# Altium PCB Karta_ILS.PCBDOC (part 6 of 9)
Units mm, origin at the board's own origin, x right, y up, seen from the top; angles counter-clockwise.
Board outline 70 x 83.2 mm, 6 copper layers (TopLayer, Layer 1, Layer 2, Layer 3, Layer 4, Bottom Layer), stack 0.914 mm thick; 406 components, 271 nets, 1327 pads, 719 vias.
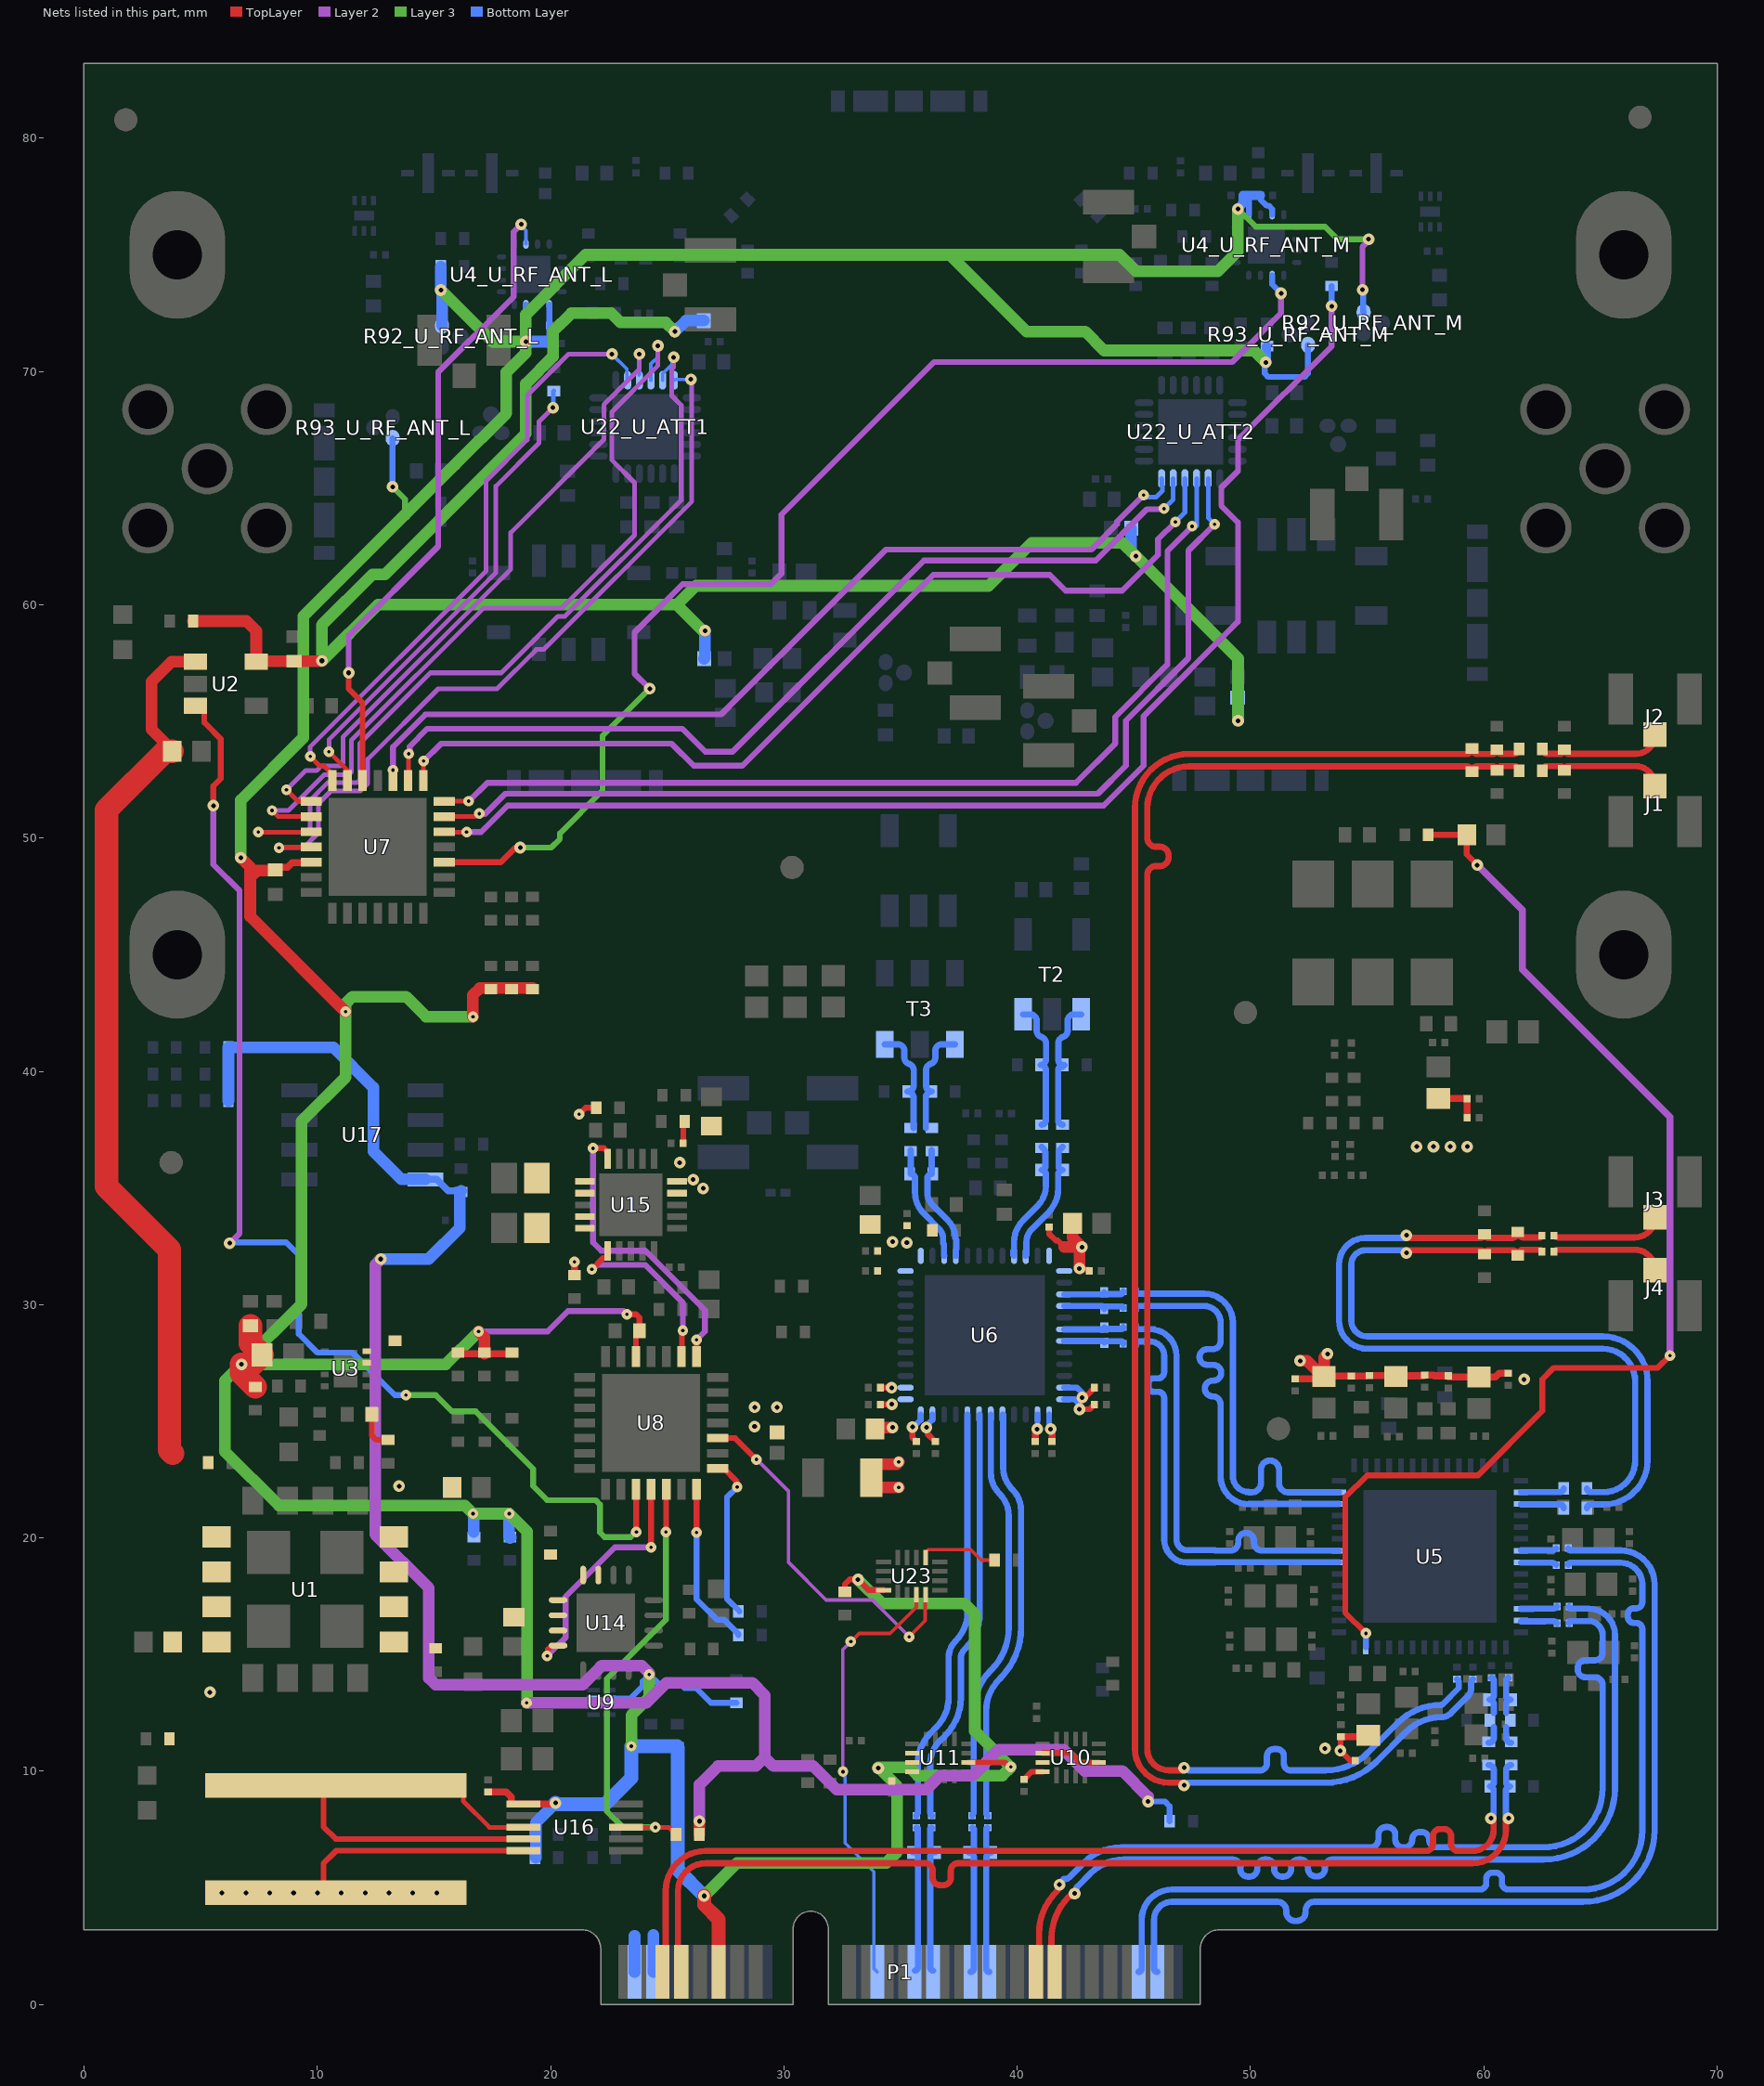
[diagram p7: the nets of this part, all layers, seen from the top]

## Via types
v1: diameter 0.5, hole 0.2, TopLayer to Bottom Layer, tented both sides, 456 vias
v2: diameter 0.45, hole 0.15, TopLayer to Bottom Layer, tented both sides, 237 vias
v3: diameter 0.45, hole 0.15, TopLayer to Bottom Layer, 23 vias
v4: diameter 0.5, hole 0.2, TopLayer to Bottom Layer, 3 vias

## Nets (pads, with @x,y where several pads share a name; then routed paths per layer and width w, separated by ;. In a path a pad name is that pad's centre, name@x,y a point inside that pad or via, vN(x,y) a via of type N, cw(c..) or ccw(c..) an arc to the next point about the centre after c; other vN are vias at no path point) (continued)
3V3_DIGIT: C9.2 C12_U_RF_ANT_L.1 C12_U_RF_ANT_M.1 C13_U_RF_ANT_L.2 C13_U_RF_ANT_M.2 C67.2 C68.2 FB1.2 R10.1 R11.1 R57.1 R58.1 R59.1 R64.1 R67.1 R68.1 R69.1 R86_U_RF_ANT_L.2 R86_U_RF_ANT_M.2 R92_U_RF_ANT_L.2 R92_U_RF_ANT_M.2 R93_U_RF_ANT_L.2 R93_U_RF_ANT_M.2 R107.2 R124.2 U4_U_RF_ANT_L.5 U4_U_RF_ANT_L.7 U4_U_RF_ANT_M.5 U4_U_RF_ANT_M.7 U7.5 U8.5 U9.7 | length 241.5
  TopLayer w0.25: v2(23.269,29.581) 23.664,29.581 23.81,29.435 C67.2@23.81,28.876 23.81,28.826 23.66,28.676 U8.5@23.66,27.779
  TopLayer w0.3: C68.2@8.203,48.569 8.378,48.744 8.728,48.744 8.921,48.938 9.711,48.938 U7.5@9.744,48.97 ; R69.1@16.032,27.892 17.162,27.892 R67.1@18.351,27.892
  TopLayer w0.5: v1(6.724,49.155) 7.125,48.754 7.125,48.314 ; C68.2@8.203,48.607 7.418,48.607 7.125,48.314 ; v2(11.214,42.555) 7.125,46.644 7.125,48.314 ; v2(16.673,42.343) 16.673,43.277 16.966,43.57 R59.1@19.223,43.57 ; v2(16.916,28.848) 17.162,28.603 R68.1@17.162,27.942 R68.1@17.162,27.892 ; R107.2@26.379,7.285 v1(26.379,7.858)
  TopLayer w1: C9.2@7.134,29.095 7.134,28.347 FB1.2@7.636,27.846 7.233,27.442 v4(6.751,27.442) 6.751,27.062 R124.2@7.339,26.475
  Layer 2 w0.25: v2(16.916,28.848) 19.877,28.848 20.747,29.719 23.131,29.719 v2(23.269,29.581) ; v1(54.8,73.5) 54.8,75.342 55.059,75.601 v1(55.059,75.669)
  Layer 2 w0.5: v2(18.976,12.931) 24.105,12.931 24.959,13.785 28.646,13.785 28.649,13.788 29.179,13.258 29.179,10.597 ; v1(26.379,7.858) 26.379,9.42 27.179,10.22 28.802,10.22 29.179,10.597 ; v1(45.61,8.703) 45.61,8.908 44.503,10.015 42.887,10.015 41.975,10.926 39.203,10.926 38.083,9.806 36.698,9.806 36.101,9.209 32.269,9.209 31.257,10.22 29.555,10.22 29.179,10.597
  Layer 3 w0.25: v1(13.229,65.054) 13.758,64.524 13.758,63.858 ; v1(49.463,76.962) 50.226,76.2 53.2,76.2 53.731,75.669 v1(55.059,75.669)
  Layer 3 w0.5: v1(6.724,49.155) 6.724,51.621 9.4,54.297 9.4,59.5 13.758,63.858 15.9,66 18.1,68.2 18.1,69.966 18.936,70.803 v1(18.936,71.278) ; v1(15.294,73.489) 17.505,71.278 v1(18.936,71.278) ; v2(16.673,42.343) 14.661,42.343 13.804,43.2 11.507,43.2 11.214,42.907 v2(11.214,42.555) 11.214,39.749 9.332,37.866 9.332,30.023 v4(6.751,27.442) ; v2(16.916,28.848) 15.51,27.442 v4(6.751,27.442) ; v2(18.976,12.931) 18.987,12.941 18.987,20.28 v2(18.227,21.04) v2(16.674,21.04) 16.322,21.392 8.352,21.392 6.05,23.693 6.05,26.741 v4(6.751,27.442) ; v1(49.463,76.962) 49.463,75.16 48.603,74.3 45.082,74.3 44.382,75 37.108,75 ; v1(50.659,70.391) 50.15,70.9 43.724,70.9 42.916,71.708 40.4,71.708 37.108,75 ; v1(18.936,71.278) 18.936,72.436 21.5,75 37.108,75
  Bottom Layer w0.25: v1(13.229,65.054) R93_U_RF_ANT_L.2@13.229,67.143 ; v1(18.936,71.278) 18.934,71.281 18.934,72.854 U4_U_RF_ANT_L.7@18.944,72.864 ; 19.944,71.4 C12_U_RF_ANT_L.1@19.944,71.982 U4_U_RF_ANT_L.5@19.944,72.864 ; v1(45.61,8.703) 46.331,8.703 46.532,8.502 R64.1@46.532,7.858 ; C13_U_RF_ANT_M.2@49.688,77.534 49.928,77.294 U4_U_RF_ANT_M.5@49.928,76.719 ; 50.454,77.34 50.685,77.109 50.782,77.109 50.928,76.962 U4_U_RF_ANT_M.7@50.928,76.719 ; v1(50.659,70.391) 50.611,70.343 50.611,69.915 50.757,69.769 52.317,69.769 52.463,69.915 R93_U_RF_ANT_M.2@52.463,71.138 ; v1(54.8,73.5) 54.824,73.476 54.824,72.563 R92_U_RF_ANT_M.2@54.848,72.538
  Bottom Layer w0.4: v1(49.463,76.962) 49.463,76.989 49.688,77.214 49.688,77.534 C13_U_RF_ANT_M.2@49.688,77.544 C12_U_RF_ANT_M.1@50.429,77.544 ; v1(50.659,70.391) 50.678,70.41 50.678,71.063 50.703,71.088 R86_U_RF_ANT_M.2@50.708,71.088
  Bottom Layer w0.5: R86_U_RF_ANT_L.2@15.294,74.5 v1(15.294,73.489) 15.35,73.433 R92_U_RF_ANT_L.2@15.35,71.961 ; v2(16.674,21.04) 16.711,21.003 16.711,20.264 ; v2(18.227,21.04) 18.227,20.081 18.288,20.019 R11.1@18.257,19.989 ; v1(18.936,71.278) C13_U_RF_ANT_L.2@19.822,71.278
3V3_MB: C14.1 C70.1 C153.2 C154.2 P1.11 R1.1 R63.2 R65.2 R66.2 R75.1 R76.2 R110.1 R111.1 R112.2 R113.2 U9.2 U10.6 U10.14 U10.15 U10.16 U11.6 U11.14 U11.15 U11.16 U16.6 U17.8 U23.16 | length 123.9
  TopLayer w0.25: R75.1@32.61,17.689 32.61,18.003 32.828,18.221 v1@33.173,18.221 ; v1(33.179,18.214) 33.629,17.764 U23.16@34.277,17.764 ; U11.6@37.9,10.379 39.473,10.379 39.669,10.182 v3(39.727,10.182) ; C70.1@40.287,9.65 40.297,9.65 40.322,9.675 40.322,9.68 40.62,9.979 U10.16@41.095,9.979 ; U10.14@41.095,10.779 42.288,10.779 42.688,10.379 U10.6@43.495,10.379
  TopLayer w0.3: C153.2@17.323,9.107 18.102,9.107 18.316,8.893 18.316,8.594 U16.6@18.827,8.594 20.111,8.594 20.155,8.638 v1(20.209,8.638)
  TopLayer w0.6: v1(26.579,4.655) 26.579,4.274 27.2,3.653 P1.11@27.2,1.4
  Layer 2 w0.5: v1(12.725,31.953) 12.48,31.708 12.48,20.153 14.783,17.85 14.783,13.993 15.076,13.7 21.376,13.7 22.195,14.52 23.91,14.52 24.224,14.206 v2(24.224,14.148)
  Layer 3 w0.5: v3(23.465,11.069) 23.465,12.401 24.224,13.161 v2(24.224,14.148) ; v1(26.579,4.655) 27.995,6.071 34.391,6.071 34.86,6.54 34.86,9.356 34.087,10.13 v1(34.046,10.13) ; v1(33.179,18.214) 34.198,17.196 37.731,17.196 38.184,16.742 38.184,11.721 39.724,10.182 v3(39.727,10.182) ; v1@34.046,10.171 35.372,10.171 35.732,9.811 39.36,9.811 v3@39.727,10.178
  Bottom Layer w0.2: U9.2@22.514,13.131 23.428,13.131
  Bottom Layer w0.25: 23.428,13.131 23.952,13.656 23.952,13.855 24.224,14.127 v2(24.224,14.148) 24.656,13.716 25.589,13.716 25.745,13.56 26.243,13.56 26.875,12.928 R1.1@27.966,12.928
  Bottom Layer w0.3: U17.8@14.637,35.374 15.112,35.374 15.605,34.88 R112.2@16.161,34.88
  Bottom Layer w0.5: R63.2@6.19,38.743 R76.2@6.19,39.886 R113.2@6.19,41.029 10.686,41.029 12.404,39.312 12.404,36.577 13.607,35.374 U17.8@14.637,35.374 ; v1(12.725,31.953) 14.774,31.953 16.111,33.29 16.111,34.83 R112.2@16.161,34.88 ; R111.1@19.378,6.297 19.378,7.282 19.375,7.285 19.375,7.805 v1(20.209,8.638)
  Bottom Layer w0.6: v1(20.209,8.638) 20.255,8.592 22.352,8.592 23.465,9.705 v3(23.465,11.069) 25.429,11.069 R66.2@25.429,11.019 25.453,10.995 25.453,5.78 v1(26.579,4.655)
3V6_DCDC: C2.2 C6.2 C91.2 C139.2 C140.2 R2.2 R97.2 R120.2 R123.1 U1.9 U1.10 U1.11 U1.12 U3.7 U3.8 U14.1 U14.2 U14.3 U14.15 U14.16 U15.1 U15.2 U15.4 U15.5 | length 1.7
  TopLayer w0.25: C6.2@12.34,25.299 12.34,24.388 12.527,24.201 R2.2@13.029,24.201
  other v4: 13.508,22.219
5V: C4.2 FB24.1 FB25.1 FB26.1 FB27.1 R122.2 U2.5 | length 84.1
  TopLayer w0.5: R122.2@4.679,59.3 6.96,59.3 7.384,58.876 U2.5@7.384,57.562 7.394,57.573 8.99,57.573 C4.2@9,57.583 10.183,57.583 v1(10.2,57.6)
  Layer 3 w0.5: v1(25.33,71.708) 24.937,72.1 23,72.1 22.602,72.498 20.891,72.498 20.1,71.708 20.1,70.635 18.936,69.471 18.936,67.336 12.9,61.3 12.361,61.3 10.2,59.139 v1(10.2,57.6) 12.6,60 25.419,60 ; v1(26.622,58.889) 26.53,58.889 25.419,60 ; v1(49.465,55.025) 49.465,57.699 v1(45.082,62.082) 44.516,62.648 40.615,62.648 38.779,60.812 26.231,60.812 25.419,60
  Bottom Layer w0.5: v1(25.33,71.708) 25.801,72.178 FB24.1@26.57,72.178 ; FB26.1@26.579,57.691 26.622,57.734 v1(26.622,58.889) ; FB25.1@44.888,63.272 44.888,62.277 v1(45.082,62.082) ; FB27.1@49.454,56.026 49.465,56.014 v1(49.465,55.025)
12V: C1.2 C3.2 R3.1 R106.2 R121.2 U1.1 U1.2 U1.3 U1.4 U2.1 U16.8 U16.9 | length 57.9
  TopLayer w0.2: R106.2@10.267,8.965 10.692,9.39 R106.2@10.789,9.39 15.837,9.39 16.262,8.965 16.262,8.714 17.382,7.594 U16.8@18.827,7.594
  TopLayer w0.25: R106.2@10.267,8.965 10.267,7.62 10.793,7.094 U16.9@18.827,7.094
  TopLayer w0.5: C3.2@3.783,53.721 3.783,53.771 2.895,54.66 2.895,56.696 3.761,57.562 U2.1@4.784,57.562
  TopLayer w1: C3.2@3.783,53.721 3.489,53.721 0.965,51.198 0.965,35.06 3.661,32.364 3.661,23.769 3.8,23.629
  other v4: 5.401,13.387
2122_0VDD: C88.2 C89.2 C90.2 C179.2 FB7.2 U6.25 U6.26 U6.35 U6.36 | length 9
  TopLayer w0.25: v1(35.509,24.753) 35.509,24.304 35.642,24.172 35.642,24.162 35.667,24.137 C90.2@35.677,24.137 ; v1(36.109,24.732) 36.157,24.685 36.157,24.462 36.482,24.137 C179.2@36.492,24.137
  TopLayer w0.3: C89.2@40.779,24.137 40.779,24.538 40.855,24.614 v1(40.855,24.668) ; v1(41.431,24.668) 41.431,24.614 41.492,24.552 C88.2@41.492,24.137
  TopLayer w0.5: v3(34.924,22.166) 33.975,22.166 33.75,22.391 FB7.2@33.75,22.585 33.75,22.93 33.975,23.155 34.825,23.155 v3(34.924,23.254)
  Bottom Layer w0.25: v1(35.509,24.753) 35.553,24.753 35.867,25.067 U6.36@35.867,25.292 ; v1(36.109,24.732) 36.157,24.78 36.157,24.857 36.367,25.067 U6.35@36.367,25.292 ; U6.25@41.367,25.292 41.367,24.799 41.431,24.736 v1(41.431,24.668) ; v1@40.867,24.681 U6.26@40.867,25.292 v1@40.867,24.681 ; v1@40.867,24.681 v1(40.855,24.668) v1@40.867,24.681
2122_VCC: C76.2 C77.2 C78.2 C79.2 C80.2 C81.2 C82.2 C83.2 C84.2 C85.2 C86.2 C87.2 FB6.2 R96.1 U6.1 U6.12 U6.13 U6.23 U6.24 U6.37 U6.38 U6.48 | length 9.8
  TopLayer w0.25: C81.2@34.129,25.723 34.135,25.728 34.626,25.728 v1(34.631,25.734) ; C83.2@34.129,26.442 34.132,26.44 34.612,26.44 v1(34.615,26.438) ; C77.2@41.367,33.328 41.367,33.03 41.652,32.745 41.733,32.745 42.015,32.463 ; v1(42.669,25.516) 43.104,25.516 43.277,25.688 43.287,25.688 43.312,25.713 C80.2@43.312,25.723 ; v1(42.669,31.552) 42.717,31.504 43.025,31.504 43.046,31.483 43.056,31.483 43.081,31.458 C78.2@43.081,31.448 ; v1(42.786,26.018) 42.834,26.066 42.945,26.066 43.312,26.432 C85.2@43.312,26.442
  TopLayer w0.5: C86.2@33.899,24.663 33.967,24.731 v1(34.658,24.731) ; 42.015,32.463 v1(42.772,32.463) ; C76.2@42.372,33.486 42.372,32.863 v1(42.772,32.463) ; v1(42.669,31.552) 42.669,32.36 v1(42.772,32.463)
  Bottom Layer w0.25: U6.24@42.017,25.942 42.452,25.942 42.669,25.725 v1(42.669,25.516) ; U6.23@42.017,26.442 42.561,26.442 42.786,26.218 v1(42.786,26.018)
  other v1: 28.744,24.772 28.744,25.598 29.701,25.602 35.27,32.652 34.661,32.692
4610_FINE_3V3: C93.2 C94.2 C97.2 C98.2 C101.2 C102.2 C105.2 C106.2 C109.2 C110.2 C129.2 C130.2 FB8.1 FB9.1 FB10.1 FB11.1 FB12.1 R100.2 R104.2 R105.2 U15.14 U15.15 | length 18.6
  TopLayer w0.25: v2(21.223,38.16) 21.505,38.442 R104.2@22.01,38.442 ; C130.2@25.68,36.925 25.688,36.934 25.688,37.847 R100.2@25.696,37.855 ; C98.2@53.873,11.481 53.859,11.468 53.859,10.894 v1(53.846,10.881) 54.266,10.461 C97.2@54.495,10.461
  TopLayer w0.3: R105.2@21.023,31.214 v2(21.023,31.834) ; C105.2@51.923,26.821 53.052,26.821 FB11.1@53.151,26.919 53.179,26.948 C106.2@54.314,26.948 54.324,26.948 54.331,26.941 54.977,26.941 54.993,26.956 C102.2@55.091,26.956 56.19,26.956 FB10.1@56.234,26.913 56.27,26.949 C101.2@57.408,26.949 ; C98.2@53.978,11.474 54.979,11.474 FB9.1@55.049,11.544 ; C101.2@57.471,26.977 57.847,26.977 57.874,26.949 C94.2@58.484,26.949 ; FB12.1@58.054,38.836 C110.2@59.278,38.836 C109.2@59.278,38.01 ; C94.2@58.484,26.906 59.779,26.906 FB8.1@59.788,26.898 60.498,26.898 60.656,27.056 60.941,27.056 C93.2@61.049,27.056
  TopLayer w0.5: v1(52.126,27.592) 52.427,27.592 53.101,26.919 FB11.1@53.151,26.919 53.151,27.742 v1(53.298,27.889)
  other v1: 53.194,10.977 61.73,26.792 26.538,34.985 26.11,35.361 25.535,36.091 57.119,36.77 57.842,36.77 58.565,36.77 59.288,36.77
04610_Stat0: R5.1 U23.9 | length 3.4
  TopLayer w0.15: U23.9@36.077,19.164 36.077,19.389 36.187,19.5 38.006,19.5 38.456,19.05 R5.1@39.033,19.05
04610_Stat0_3V3: U8.24 U23.4 | length 15.6
  TopLayer w0.15: v2(35.372,15.761) 36.06,16.45 36.06,17.548 U23.4@36.077,17.564
  TopLayer w0.25: U8.24@27.16,24.279 27.91,24.279 v2(28.827,23.363)
  Layer 2 w0.15: v2(28.827,23.363) 30.2,21.99 30.2,18.946 31.81,17.336 33.797,17.336 v2(35.372,15.761)
+12: P1.2 P1.4 R106.1 U16.10 | length 13.5
  TopLayer w0.25: R106.1@10.789,4.79 10.692,4.79 10.267,5.215 10.267,6.053 10.808,6.594 U16.10@18.827,6.594
  Bottom Layer w0.5: P1.2@23.6,1.4 23.6,2.952 ; P1.4@24.4,1.4 24.4,2.99
  other v1: 5.921,4.776 6.942,4.776 7.964,4.776 8.986,4.776 10.008,4.776 11.029,4.776 12.051,4.776 13.073,4.776 14.095,4.776 15.117,4.776
Ain_2122_A_N: R47.1 R49.2 U6.4 | length 5.1
  Bottom Layer w0.268: R49.2@36.342,36.627 36.337,36.627 36.337,35.604 ccw(c36.337,35.418) 36.151,35.418 36.151,34.802 ccw(c36.891,34.802) 36.367,34.278 37.034,33.612 cw(c36.278,32.857) 37.347,32.857 37.347,32.854 cw(c37.251,32.758) 37.386,32.758 37.386,32.377 ccw(c37.41,32.353) 37.376,32.353 37.376,32.101 U6.4@37.367,32.092
AIn_2122_A_P: R45.2 R47.2 U6.3 | length 5.1
  Bottom Layer w0.268: R45.2@35.43,36.627 35.437,36.627 35.437,35.604 cw(c35.437,35.418) 35.623,35.418 35.623,34.8 ccw(c36.887,34.8) 35.993,33.906 36.658,33.241 cw(c36.271,32.854) 36.819,32.854 36.819,32.663 ccw(c36.886,32.663) 36.838,32.615 cw(c36.791,32.567) 36.858,32.567 36.858,32.101 U6.3@36.867,32.092
AIn_2122_B_N: R53.1 R56.2 U6.9 | length 5.4
  Bottom Layer w0.268: U6.9@39.867,32.092 39.839,32.12 39.839,32.291 cw(c39.887,32.291) 39.853,32.325 ccw(c39.819,32.359) 39.867,32.359 39.867,32.682 cw(c41.182,32.682) 40.252,33.612 40.875,34.235 ccw(c40.011,35.099) 41.233,35.099 41.233,35.585 ccw(c41.047,35.585) 41.047,35.771 ccw(c41.047,35.937) 41.213,35.937 41.213,36.507 ccw(c40.988,36.507) R56.2@41.147,36.666 ; R56.2@41.047,36.766 R56.2@41.147,36.666
AIn_2122_B_P: R51.2 R53.2 U6.10 | length 5.4
  Bottom Layer w0.268: U6.10@40.367,32.092 40.395,32.12 40.395,32.678 cw(c41.191,32.678) 40.628,33.241 41.326,33.939 ccw(c40.275,34.989) 41.761,34.989 41.761,35.585 cw(c41.947,35.585) 41.947,35.771 cw(c41.947,35.947) 41.771,35.947 41.771,36.403 ccw(c41.747,36.427) 41.781,36.427 41.781,36.507 cw(c42.007,36.507) 41.847,36.666 R51.2@41.947,36.766
Ain_2122A_N: R48.1 R49.1 T3.3 | length 4.8
  Bottom Layer w0.268: R49.1@36.085,37.577 36.085,38.878 cw(c36.342,38.878) R48.1@36.342,39.135 cw(c36.342,39.386) 36.091,39.386 36.091,39.68 36.091,40.058 cw(c36.359,40.058) 36.286,40.315 ccw(c36.207,40.588) 36.491,40.588 36.491,40.89 cw(c36.759,40.89) 36.759,41.158 T3.3@37.327,41.158
AIn_2122A_P: R45.1 R46.2 T3.1 | length 4.8
  Bottom Layer w0.268: T3.1@34.327,41.158 34.895,41.158 cw(c34.895,40.89) 35.163,40.89 35.163,40.588 ccw(c35.447,40.588) 35.37,40.315 cw(c35.295,40.058) 35.563,40.058 35.563,39.399 cw(c35.3,39.399) R46.2@35.3,39.135 cw(c35.3,38.878) 35.557,38.878 R45.1@35.557,37.577
AIn_2122B_N: R55.1 R56.1 T2.1 | length 5.7
  Bottom Layer w0.268: T2.1@40.248,42.443 40.566,42.443 cw(c40.566,42.175) 40.834,42.175 40.834,41.743 ccw(c41.118,41.743) 41.041,41.47 cw(c40.966,41.212) 41.234,41.212 41.234,40.504 cw(c41.006,40.504) R55.1@41.006,40.275 cw(c41.006,40.047) 41.233,40.047 41.233,37.902 cw(c41.047,37.902) R56.1@41.047,37.716
AIn_2122B_P: R51.1 R52.2 T2.3 | length 5.9
  Bottom Layer w0.268: R51.1@41.947,37.716 cw(c41.947,37.902) 41.761,37.902 41.761,40.056 cw(c41.98,40.056) R52.2@41.98,40.275 cw(c41.98,40.492) 41.762,40.492 41.762,41.212 cw(c42.03,41.212) 41.957,41.47 ccw(c41.878,41.743) 42.162,41.743 42.162,42.175 cw(c42.43,42.175) 42.43,42.443 T2.3@42.748,42.443 ; R52.2@41.947,40.192 cw(c42.03,40.192) R52.2@42.03,40.275
Alert_curr_vol_meas: R107.1 U8.19 U16.3 | length 19.5
  TopLayer w0.2: U16.3@23.227,7.594 v2(24.491,7.594) 25.069,7.594 R107.1@25.379,7.285 R107.1@25.429,7.285
  TopLayer w0.25: v2(24.945,20.249) 24.953,20.257 24.953,22.072 U8.19@24.96,22.079
  Layer 3 w0.25: v2(24.491,7.594) 23.103,7.594 22.419,8.278 22.419,13.969 24.945,16.495 v2(24.945,20.249)
ATT_330_V1: R91_U_ATT2.2 U7.19 | length 55.7
  TopLayer w0.2: U7.19@15.443,50.27 15.458,50.256 v2(16.402,50.256)
  Layer 2 w0.25: v2(16.402,50.256) 17.019,50.256 18.154,51.39 43.708,51.39 45.418,53.1 45.418,55.224 49.463,59.269 49.463,63.537 48.747,64.253 48.747,65.012 49.463,65.729 49.463,67.063 53.478,71.078 v1(53.478,72.8)
  Bottom Layer w0.25: v1(53.478,72.8) R91_U_ATT2.2@53.478,73.669
ATT_330_V2: U7.20 U22_U_ATT2.20 | length 44.1
  TopLayer w0.2: U7.20@15.443,50.92 16.754,50.92 16.881,51.048 v2(16.949,51.048)
  Layer 2 w0.25: v2(16.949,51.048) 16.973,51.024 17.18,51.024 18.056,51.9 43.459,51.9 44.659,53.1 44.659,55.031 47.338,57.71 47.338,62.324 v2(48.463,63.449)
  Bottom Layer w0.2: U22_U_ATT2.20@48.188,65.412 48.188,63.728 48.463,63.453 v2(48.463,63.449)
ATT_330_V3: U7.21 U22_U_ATT2.21 | length 42.7
  TopLayer w0.2: U7.21@15.443,51.57 15.451,51.577 16.477,51.577 v2(16.484,51.585)
  Layer 2 w0.25: v2(16.484,51.585) 16.511,51.585 17.294,52.368 42.519,52.368 44.2,54.049 44.2,55.196 46.438,57.434 46.438,62.303 v2(47.5,63.365)
  Bottom Layer w0.2: v2(47.5,63.365) 47.54,63.365 47.601,63.304 47.688,63.39 U22_U_ATT2.21@47.688,65.412
ATT_330_V4: U7.22 U22_U_ATT2.22 | length 41.1
  TopLayer w0.2: U7.22@14.544,52.47 14.544,53.266 14.561,53.284 v2(14.561,53.303)
  Layer 2 w0.25: v2(14.561,53.303) 15.308,54.049 25.186,54.049 26.135,53.1 28.22,53.1 36.4,61.28 41.4,61.28 42.08,60.6 44.502,60.6 46.038,62.136 46.038,62.809 v2(46.782,63.553)
  Bottom Layer w0.2: v2(46.782,63.553) 47.188,63.959 U22_U_ATT2.22@47.188,65.412
ATT_330_V5: U7.23 U22_U_ATT2.23 | length 40.3
  TopLayer w0.2: U7.23@13.894,52.47 13.908,52.485 13.908,53.597 v2(13.922,53.612)
  Layer 2 w0.25: v2(13.922,53.612) 13.958,53.647 13.958,53.924 14.722,54.688 25.642,54.688 26.63,53.7 27.8,53.7 36,61.9 43.366,61.9 45.562,64.096 46.269,64.096 v2(46.294,64.122)
  Bottom Layer w0.2: v2(46.294,64.122) 46.688,64.516 U22_U_ATT2.23@46.688,65.412
ATT_330_V6: U7.24 U22_U_ATT2.24 | length 39.6
  TopLayer w0.2: U7.24@13.244,52.47 v2(13.244,52.915)
  Layer 2 w0.25: v2(13.244,52.915) 13.244,53.906 14.638,55.3 27.3,55.3 34.366,62.366 43.183,62.366 44.279,63.462 44.279,63.572 v2(45.413,64.706)
  Bottom Layer w0.2: v2(45.413,64.706) 45.497,64.622 45.967,64.622 46.223,64.878 46.223,65.057 46.207,65.073 46.207,65.393 U22_U_ATT2.24@46.188,65.412
ATT_ILS_V1: R91_U_ATT1.2 U7.27 | length 21
  TopLayer w0.2: v2(10.5,53.7) 11.294,52.906 U7.27@11.294,52.47
  Layer 2 w0.2: v2(10.5,53.7) 10.5,54.219 17.658,61.376 17.658,65.086 19.503,66.931 19.503,67.851 v1(20.1,68.448)
  Bottom Layer w0.2: v1(20.1,68.448) 20.118,68.466 20.118,69.143 R91_U_ATT1.2@20.136,69.161
ATT_ILS_V2: U7.28 U22_U_ATT1.20 | length 26.6
  TopLayer w0.2: v2(9.7,53.5) 10.106,53.094 10.285,53.094 10.644,52.735 U7.28@10.644,52.47
  Layer 2 w0.2: v2(9.7,53.5) 9.7,53.914 17.231,61.445 17.231,65.298 19,67.067 19,68.968 20.778,70.746 v1(22.63,70.746)
  Bottom Layer w0.15: v1(22.63,70.746) 23.275,70.101 U22_U_ATT1.20@23.275,69.621
ATT_ILS_V3: U7.1 U22_U_ATT1.21 | length 27.9
  TopLayer w0.2: v2(8.677,52.065) 9.171,51.57 U7.1@9.744,51.57
  Layer 2 w0.2: v2(8.677,52.065) 9.505,52.893 9.979,52.893 10.186,53.1 10.991,53.1 11.108,53.217 11.108,54.332 18.295,61.519 18.295,63.095 22.28,67.08 22.28,68.576 23.807,70.103 v1(23.807,70.746)
  Bottom Layer w0.15: U22_U_ATT1.21@23.787,69.846 23.797,69.856 23.797,70.736 v1(23.807,70.746)
ATT_ILS_V4: U7.2 U22_U_ATT1.22 | length 34
  TopLayer w0.2: v2(8.061,51.185) 8.326,50.92 U7.2@9.744,50.92
  Layer 2 w0.2: v2(8.061,51.185) 8.766,51.185 10.298,52.718 11.348,52.718 11.465,52.835 11.465,54.194 17.121,59.85 20.466,59.85 23.6,62.984 23.6,65.231 22.63,66.201 22.63,68.277 24.602,70.249 v1(24.602,71.1)
  Bottom Layer w0.15: U22_U_ATT1.22@24.302,69.621 24.302,70.323 24.602,70.623 v1(24.602,71.1)
ATT_ILS_V5: U7.3 U22_U_ATT1.23 | length 35.4
  TopLayer w0.2: v2(7.47,50.256) 9.729,50.256 U7.3@9.744,50.27
  Layer 2 w0.2: v2(7.47,50.256) 9.583,50.256 9.7,50.373 9.7,51.624 10.443,52.368 11.698,52.368 11.815,52.485 11.815,54.049 14.849,57.083 17.894,57.083 20.311,59.5 20.611,59.5 25.6,64.489 25.6,68.551 25.2,68.951 25.2,70.1 25.28,70.18 v1(25.28,70.604)
  Bottom Layer w0.15: U22_U_ATT1.23@24.802,69.621 24.802,69.902 25.213,70.313 25.213,70.537 v1(25.28,70.604)
ATT_ILS_V6: U7.4 U22_U_ATT1.24 | length 32.6
  TopLayer w0.2: v2(8.362,49.585) 8.38,49.603 9.726,49.603 U7.4@9.744,49.62
  Layer 2 w0.2: v2(8.362,49.585) 9.407,49.585 10.05,50.228 10.05,51.479 10.588,52.018 11.85,52.018 12.165,52.333 12.165,53.383 15.183,56.4 17.706,56.4 19.387,58.081 19.704,58.081 26.052,64.428 26.052,69.621 v1(26.013,69.66)
  Bottom Layer w0.15: U22_U_ATT1.24@25.302,69.621 25.341,69.66 v1(26.013,69.66)
CLK_SYNC: P1.20 U23.3 | length 18.9
  TopLayer w0.15: v2(32.868,15.554) 33.225,15.911 34.555,15.911 35.677,17.033 U23.3@35.677,17.564
  Layer 2 w0.15: v2(32.535,9.981) 32.524,9.993 32.524,15.21 v2(32.868,15.554)
  Bottom Layer w0.15: v2(32.535,9.981) 32.593,9.924 32.593,9.774 32.623,9.743 32.623,6.922 33.854,5.691 33.854,1.546 P1.20@34,1.4
CLKin0_N: J1.2 R24.1 R25.2 | length 5.6
  TopLayer w0.268: R24.1@62.509,52.882 cw(c62.711,52.882) 62.711,53.084 63.273,53.084 cw(c63.273,52.905) R25.2@63.451,52.905 cw(c63.63,52.905) 63.63,53.084 66.49,53.084 cw(c66.49,52.233) J1.2@67.34,52.233
CLKin0_P: J2.2 R28.1 R30.1 | length 5.6
  TopLayer w0.268: R30.1@62.509,53.819 ccw(c62.716,53.819) 62.716,53.612 63.275,53.612 ccw(c63.275,53.79) R28.1@63.454,53.79 ccw(c63.632,53.79) 63.632,53.612 66.516,53.612 ccw(c66.516,54.435) J2.2@67.34,54.435
CLKin0P_N: C46.2 R24.2 R26.2 R27.2 | length 76
  TopLayer w0.268: v1(47.157,10.153) cw(c47.041,10.153) 47.041,10.037 46.502,10.037 cw(c46.502,10.965) 45.574,10.965 45.574,47.467 45.574,48.428 cw(c45.946,48.428) 45.946,48.8 46.115,48.8 ccw(c46.115,49.172) 46.487,49.172 46.487,49.255 ccw(c46.115,49.255) 46.115,49.627 45.946,49.627 cw(c45.946,49.999) 45.574,49.999 45.574,51.018 45.574,51.281 cw(c47.368,51.281) 47.368,53.075 59.254,53.075 cw(c59.254,52.839) R27.2@59.49,52.839 cw(c59.726,52.839) 59.726,53.075 60.399,53.075 cw(c60.399,52.905) R26.2@60.569,52.905 cw(c60.75,52.905) 60.75,53.086 61.305,53.086 cw(c61.305,52.882) R24.2@61.509,52.882
  Bottom Layer w0.268: v1(47.157,10.153) 47.219,10.153 47.335,10.037 50.28,10.037 50.414,10.037 ccw(c50.414,10.327) 50.704,10.327 50.704,10.657 cw(c50.994,10.657) 50.994,10.947 51.139,10.947 cw(c51.139,10.657) 51.429,10.657 51.429,10.327 ccw(c51.719,10.327) 51.719,10.037 52.984,10.037 53.225,10.037 ccw(c53.225,12.577) 55.021,10.781 56.32,12.081 cw(c58.163,10.238) 58.163,12.844 ; 58.164,12.844 ccw(c58.164,12.941) 58.233,12.872 58.928,13.568 58.928,13.773 ccw(c58.686,13.773) 58.857,13.945 C46.2@58.847,13.945
CLKin0P_P: C47.2 R27.1 R29.1 R30.2 | length 76
  TopLayer w0.268: v1(47.157,9.393) ccw(c47.041,9.393) 47.041,9.509 46.502,9.509 cw(c46.502,10.965) 45.046,10.965 45.046,51.281 cw(c47.368,51.281) 47.368,53.603 59.254,53.603 ccw(c59.254,53.839) R27.1@59.49,53.839 ccw(c59.726,53.839) 59.726,53.603 60.369,53.603 ccw(c60.369,53.79) R29.1@60.556,53.79 ccw(c60.732,53.79) 60.732,53.614 61.305,53.614 ccw(c61.305,53.819) R30.2@61.509,53.819
  Bottom Layer w0.268: v1(47.157,9.393) 47.219,9.393 47.335,9.509 53.227,9.509 ccw(c53.227,12.57) 55.392,10.406 56.693,11.707 cw(c58.164,10.235) 58.164,12.316 58.166,12.316 ccw(c58.166,12.937) 58.605,12.498 59.302,13.195 ccw(c58.93,13.567) 59.456,13.567 59.456,13.773 cw(c59.699,13.773) 59.528,13.945 C47.2@59.538,13.945
CLKin1_N: P1.5 R37.1 R39.1 | length 45.1
  TopLayer w0.268: P1.5@24.8,1.4 ccw(c24.8,1.536) 24.936,1.536 24.936,4.871 cw(c26.646,4.871) 26.646,6.581 57.378,6.581 57.512,6.581 ccw(c57.512,6.891) 57.822,6.891 57.822,7.213 cw(c58.133,7.213) 58.133,7.524 58.288,7.524 cw(c58.288,7.213) 58.598,7.213 58.598,6.891 ccw(c58.909,6.891) 58.909,6.581 59.507,6.581 ccw(c59.507,7.494) 60.421,7.494 60.421,7.869 ccw(c60.305,7.869) v1(60.305,7.985)
  Bottom Layer w0.268: R39.1@60.21,10.266 cw(c60.21,10.044) 60.431,10.044 60.431,9.519 cw(c60.26,9.519) R37.1@60.26,9.347 cw(c60.26,9.186) 60.421,9.186 60.421,8.101 cw(c60.305,8.101) v1(60.305,7.985)
CLKin1_P: P1.7 R31.1 R32.2 | length 45.1
  TopLayer w0.268: P1.7@25.6,1.4 cw(c25.6,1.536) 25.464,1.536 25.464,4.871 cw(c26.646,4.871) 26.646,6.053 35.157,6.053 36.067,6.053 cw(c36.067,5.743) 36.377,5.743 36.377,5.425 ccw(c36.688,5.425) 36.688,5.115 36.843,5.115 ccw(c36.843,5.425) 37.153,5.425 37.153,5.743 cw(c37.464,5.743) 37.464,6.053 38.1,6.053 59.507,6.053 ccw(c59.507,7.494) 60.949,7.494 60.949,7.869 cw(c61.065,7.869) v1(61.065,7.985)
  Bottom Layer w0.268: v1(61.065,7.985) cw(c61.065,8.101) 60.949,8.101 60.949,9.165 cw(c61.13,9.165) R32.2@61.13,9.347 cw(c61.13,9.519) 60.959,9.519 60.959,10.049 cw(c61.176,10.049) R31.1@61.176,10.266
CLKin1P_N: C59.2 R34.1 R38.1 R39.2 | length 2.6
  Bottom Layer w0.267: R39.2@60.21,11.216 ccw(c60.21,11.435) 60.429,11.435 60.429,11.889 ; C59.2@60.323,13.999 cw(c60.323,13.893) 60.429,13.893 60.429,13.253 cw(c60.243,13.253) 60.243,13.066 cw(c60.243,12.88) 60.429,12.88 60.429,12.489
CLKin1P_P: C54.2 R31.2 R33.2 R34.2 | length 2.6
  Bottom Layer w0.267: 60.956,11.889 60.956,11.435 ccw(c61.176,11.435) R31.2@61.176,11.216 ; 60.956,12.489 60.956,12.88 cw(c61.143,12.88) 61.143,13.066 cw(c61.143,13.253) 60.956,13.253 60.956,13.893 cw(c61.063,13.893) C54.2@61.063,13.999
CLKout1_C2_N: C58.1 J4.2 | length 4.9
  TopLayer w0.268: C58.1@63.004,32.272 C58.1@63.004,32.282 ; C58.1@63.004,32.283 cw(c63.177,32.109) 63.177,32.354 66.464,32.354 cw(c66.464,31.478) J4.2@67.34,31.478
CLKout1_C2_P: C57.1 J3.2 | length 4.9
  TopLayer w0.268: C57.1@63.007,32.953 ccw(c63.18,33.127) 63.18,32.882 66.477,32.882 ccw(c66.477,33.745) J3.2@67.34,33.745 ; C57.1@63.007,32.954 C57.1@63.007,32.964
CLKout1_C_N: C58.2 R36.2 R41.2 R42.1 | length 33
  TopLayer w0.267: R42.1@60.037,32.112 cw(c60.093,32.112) R42.1@60.093,32.168
  TopLayer w0.268: v1(56.684,32.214) cw(c56.8,32.214) 56.8,32.33 59.873,32.33 59.873,32.326 cw(c59.873,32.162) R42.1@60.037,32.162 cw(c60.201,32.162) 60.201,32.326 61.247,32.326 cw(c61.247,32.118) R41.2@61.455,32.118 cw(c61.691,32.118) 61.691,32.354 62.402,32.354 cw(c62.402,32.272) C58.2@62.484,32.272
  Bottom Layer w0.268: v1(56.684,32.214) ccw(c56.568,32.214) 56.568,32.33 54.925,32.33 ccw(c54.925,31.728) 54.323,31.728 54.323,29.317 ccw(c55,29.317) 55,28.64 65.094,28.64 cw(c65.094,26.716) 67.018,26.716 67.018,23.317 cw(c65.135,23.317) 65.135,21.435 64.585,21.435 ccw(c64.585,21.274) R36.2@64.424,21.274
CLKout1_C_P: C57.2 R35.2 R40.2 R41.1 | length 32.9
  TopLayer w0.267: R40.2@60.003,32.986 ccw(c59.921,33.068) R40.2@60.037,33.067
  TopLayer w0.268: v1(56.684,32.974) ccw(c56.8,32.974) 56.8,32.858 59.876,32.858 ccw(c59.876,32.986) R40.2@60.003,32.986 ; R40.2@60.037,33.018 ccw(c60.201,33.018) 60.201,32.854 61.191,32.854 ccw(c61.191,33.118) R41.1@61.455,33.118 ccw(c61.691,33.118) 61.691,32.882 62.405,32.882 ccw(c62.405,32.964) C57.2@62.487,32.964
  Bottom Layer w0.268: v1(56.684,32.974) cw(c56.568,32.974) 56.568,32.858 54.925,32.858 ccw(c54.925,31.728) 53.795,31.728 53.795,29.317 ccw(c55,29.317) 55,28.112 65.094,28.112 cw(c65.094,26.716) 66.49,26.716 66.49,23.317 cw(c65.135,23.317) 65.135,21.963 64.585,21.963 cw(c64.585,22.124) R35.2@64.424,22.124
CLKout1_N: R36.1 U5.17 | length 1.9
  Bottom Layer w0.268: U5.17@61.593,21.435 63.263,21.435 cw(c63.263,21.274) R36.1@63.424,21.274
CLKout1_P: R35.1 U5.16 | length 1.9
  Bottom Layer w0.268: U5.16@61.593,21.963 63.263,21.963 ccw(c63.263,22.124) R35.1@63.424,22.124
CLKout3_C_N: C51.1 P1.48 | length 42
  Bottom Layer w0.268: P1.48@45.2,1.4 ccw(c45.2,1.536) 45.336,1.536 45.336,3.632 cw(c46.634,3.632) 46.634,4.93 59.699,4.93 59.833,4.93 ccw(c59.833,5.2) 60.103,5.2 60.103,5.385 cw(c60.373,5.385) 60.373,5.655 60.508,5.655 cw(c60.508,5.385) 60.778,5.385 60.778,5.2 ccw(c61.047,5.2) 61.047,4.93 61.593,4.93 64.253,4.93 ccw(c64.253,7.47) 66.793,7.47 66.793,15.32 66.793,16.091 ccw(c66.525,16.091) 66.525,16.359 66.422,16.359 cw(c66.422,16.608) 66.173,16.608 66.173,16.733 cw(c66.422,16.733) 66.422,16.983 66.525,16.983 ccw(c66.525,17.251) 66.793,17.251 66.793,18.008 ccw(c65.866,18.008) 65.866,18.935 63.72,18.935 ccw(c63.72,18.839) C51.1@63.624,18.839
CLKout3_C_P: C50.1 P1.50 | length 42.1
  Bottom Layer w0.268: P1.50@46,1.4 cw(c46,1.536) 45.864,1.536 45.864,3.632 cw(c46.634,3.632) 46.634,4.402 50.199,4.402 51.16,4.402 cw(c51.16,4.03) 51.532,4.03 51.532,3.956 ccw(c51.904,3.956) 51.904,3.584 51.986,3.584 ccw(c51.986,3.956) 52.359,3.956 52.359,4.03 cw(c52.731,4.03) 52.731,4.402 55.563,4.402 64.253,4.402 ccw(c64.253,7.47) 67.321,7.47 67.321,18.008 ccw(c65.866,18.008) 65.866,19.463 63.72,19.463 cw(c63.72,19.559) C50.1@63.624,19.559
CLKout3_N: C51.2 U5.22 | length 1.5
  Bottom Layer w0.268: U5.22@61.593,18.935 62.896,18.935 cw(c62.896,18.642) 63.104,18.849 C51.2@63.104,18.839
CLKout3_P: C50.2 U5.21 | length 1.5
  Bottom Layer w0.268: U5.21@61.593,19.463 62.896,19.463 ccw(c62.896,19.757) 63.104,19.549 C50.2@63.104,19.559
CLKout5_C_N: C192.1 P1.39 | length 41.2
  TopLayer w0.268: P1.39@41.6,1.4 cw(c41.928,1.728) 41.464,1.728 41.464,2.819 cw(c44.004,2.819) 42.208,4.615 42.215,4.622 cw(c42.259,4.578) 42.259,4.64 ccw(c42.259,4.701) 42.302,4.658 42.356,4.712 cw(c42.463,4.604) v1(42.463,4.756)
  Bottom Layer w0.268: v1(42.463,4.756) 42.488,4.803 ccw(c42.381,4.911) 42.533,4.911 42.533,4.93 cw(c42.731,4.93) 42.591,5.07 43.134,5.613 cw(c44.584,4.162) 44.584,6.214 48.378,6.214 49.238,6.214 cw(c49.238,5.887) 49.564,5.887 49.564,5.808 ccw(c49.89,5.808) 49.89,5.482 49.963,5.482 ccw(c49.963,5.808) 50.289,5.808 50.289,5.887 cw(c50.615,5.887) 50.615,6.214 50.688,6.214 cw(c50.688,5.887) 51.014,5.887 51.014,5.808 ccw(c51.341,5.808) 51.341,5.482 51.413,5.482 ccw(c51.413,5.808) 51.739,5.808 51.739,5.887 cw(c52.066,5.887) 52.066,6.214 52.138,6.214 cw(c52.138,5.887) 52.465,5.887 52.465,5.818 ccw(c52.791,5.818) 52.791,5.492 52.864,5.492 ccw(c52.864,5.818) 53.19,5.818 53.19,5.887 cw(c53.516,5.887) 53.516,6.214 55.016,6.214 62.554,6.214 ccw(c62.554,9.282) 65.622,9.282 65.622,15.836 ccw(c64.492,15.836) 64.492,16.967 63.755,16.967 cw(c63.755,17.065) C192.1@63.658,17.065
CLKout5_C_P: C193.1 P1.37 | length 41.2
  TopLayer w0.268: P1.37@40.8,1.4 ccw(c40.472,1.728) 40.936,1.728 40.936,3.037 cw(c43.477,3.037) 41.68,4.834 ccw(c41.481,5.033) 41.763,5.033 cw(c41.915,5.033) v1(41.807,5.141)
  Bottom Layer w0.268: v1(41.807,5.141) 41.88,5.213 ccw(c41.69,5.403) v1@41.951,5.34 ; v1@41.951,5.341 cw(c42.058,5.234) 42.058,5.385 42.078,5.385 ccw(c42.078,5.583) 42.218,5.443 42.838,6.063 cw(c44.475,4.426) 44.475,6.742 55.02,6.742 55.154,6.742 ccw(c55.154,7.068) 55.48,7.068 55.48,7.28 cw(c55.806,7.28) 55.806,7.606 55.879,7.606 cw(c55.879,7.28) 56.205,7.28 56.205,7.068 ccw(c56.531,7.068) 56.531,6.742 56.604,6.742 ccw(c56.604,7.068) 56.93,7.068 cw(c57.257,7.068) 57.257,7.394 57.329,7.394 cw(c57.329,7.068) 57.655,7.068 ccw(c57.982,7.068) 57.982,6.742 58.605,6.742 62.554,6.742 ccw(c62.554,9.282) 65.094,9.282 65.094,13.568 65.094,13.702 ccw(c64.768,13.702) 64.768,14.028 64.355,14.028 cw(c64.355,14.355) 64.028,14.355 64.028,14.427 cw(c64.355,14.427) 64.355,14.754 64.768,14.754 ccw(c64.768,15.08) 65.094,15.08 65.094,15.836 ccw(c64.492,15.836) 64.492,16.439 63.755,16.439 ccw(c63.755,16.341) C193.1@63.658,16.341
CLKout5_N: C193.2 U5.27 | length 1.6
  Bottom Layer w0.268: U5.27@61.593,16.428 62.611,16.428 ccw(c62.611,16.463) 62.636,16.439 62.925,16.439 cw(c62.925,16.138) 63.138,16.351 C193.2@63.138,16.341
CLKout5_P: C192.2 U5.26 | length 1.6
  Bottom Layer w0.268: U5.26@61.593,16.956 62.094,16.956 ccw(c62.094,16.991) 62.119,16.967 62.925,16.967 ccw(c62.925,17.267) 63.138,17.055 C192.2@63.138,17.065
CLKout8_C_N: C53.1 R43.2 U6.18 | length 2.7
  Bottom Layer w0.268: U6.18@42.017,28.942 43.658,28.942 ccw(c43.658,29.017) R43.2@43.733,29.017 ccw(c43.781,29.017) 43.747,28.983 ccw(c43.812,29.048) 43.812,28.956 44.457,28.956 ccw(c44.457,29.046) C53.1@44.546,29.046
CLKout8_C_P: C52.1 R43.1 U6.19 | length 2.7
  Bottom Layer w0.268: U6.19@42.017,28.442 43.658,28.442 cw(c43.658,28.367) R43.1@43.733,28.367 cw(c43.781,28.367) 43.747,28.402 cw(c43.812,28.337) 43.812,28.428 44.443,28.428 cw(c44.443,28.326) C52.1@44.546,28.326
CLKout8_N: C53.2 U5.50 | length 18.5
  Bottom Layer w0.268: C53.2@45.066,29.046 ccw(c45.162,29.046) 45.162,28.95 45.694,28.95 cw(c45.694,27.815) 46.828,27.815 46.828,19.932 ccw(c47.286,19.932) 47.286,19.474 48.482,19.474 ccw(c48.5,19.474) 48.5,19.456 49.001,19.456 49.135,19.456 ccw(c49.135,19.793) 49.473,19.793 49.473,19.882 cw(c49.81,19.882) 50.147,19.882 50.147,19.793 ccw(c50.484,19.793) 50.484,19.456 51.948,19.456 U5.50@53.793,19.456
CLKout8_P: C52.2 U5.49 | length 18.5
  Bottom Layer w0.268: C52.2@45.066,28.326 cw(c45.162,28.326) 45.162,28.422 45.694,28.422 cw(c45.694,27.815) 46.3,27.815 46.3,27.108 cw(c46.032,27.108) 46.032,26.84 45.827,26.84 ccw(c45.827,26.64) 45.627,26.64 45.627,26.468 ccw(c45.827,26.468) 45.827,26.268 46.032,26.268 cw(c46.032,26) 46.3,26 46.3,25.365 46.3,19.932 ccw(c47.286,19.932) 47.286,18.946 48.482,18.946 48.482,18.956 U5.49@53.793,18.956
CLKout10_C_N: C56.1 R44.2 U6.16 | length 2.7
  Bottom Layer w0.268: U6.16@42.017,29.942 43.604,29.942 cw(c43.604,29.817) R44.2@43.729,29.817 cw(c43.837,29.817) 43.837,29.926 44.467,29.926 cw(c44.467,29.847) C56.1@44.546,29.847
CLKout10_C_P: C55.1 R44.1 U6.15 | length 2.7
  Bottom Layer w0.268: U6.15@42.017,30.442 43.634,30.442 ccw(c43.634,30.537) R44.1@43.729,30.537 ccw(c43.812,30.537) 43.812,30.454 44.433,30.454 ccw(c44.433,30.567) C55.1@44.546,30.567
CLKout10_N: C56.2 U5.54 | length 18.5
  Bottom Layer w0.268: C56.2@45.066,29.847 cw(c45.162,29.847) 45.162,29.943 48.01,29.943 cw(c48.01,29.237) 48.716,29.237 48.716,28.429 cw(c48.378,28.429) 48.378,28.092 48.151,28.092 ccw(c48.151,27.755) 48.151,27.417 48.408,27.417 cw(c48.408,27.08) 48.408,26.743 48.378,26.743 ccw(c48.378,26.406) 48.378,26.069 cw(c48.378,25.731) 48.716,25.731 48.716,24.381 48.716,22.651 ccw(c49.923,22.651) 49.923,21.443 49.923,21.456 U5.54@53.793,21.456
CLKout10_P: C55.2 U5.55 | length 18.5
  Bottom Layer w0.268: C55.2@45.066,30.567 ccw(c45.162,30.567) 45.162,30.471 48.01,30.471 cw(c48.01,29.237) 49.244,29.237 49.244,22.651 ccw(c49.923,22.651) 49.923,21.971 49.923,21.956 ; 49.924,21.956 50.058,21.956 ccw(c50.058,22.344) 50.446,22.344 50.446,22.928 cw(c50.834,22.928) 51.222,22.928 51.222,22.344 ccw(c51.61,22.344) 51.61,21.956 53.789,21.956 U5.55@53.793,21.956
CMLOUT_A_N: C64.2 P1.26 R82.1 | length 7.7
  Bottom Layer w0.268: C64.2@36.275,7.551 36.275,6.809 ccw(c36.511,6.809) 36.511,6.573 ccw(c36.511,6.337) 36.275,6.337 36.275,1.584 ccw(c36.408,1.584) P1.26@36.408,1.452 ; C64.2@36.34,7.571 ccw(c36.34,7.499) 36.268,7.499 36.268,6.756 ccw(c36.504,6.756) R82.1@36.504,6.52
CMLOUT_A_P: C63.2 P1.24 R82.2 | length 7.7
  Bottom Layer w0.268: R82.2@35.504,6.52 ccw(c35.504,6.756) 35.74,6.756 35.74,7.511 ccw(c35.68,7.511) C63.2@35.68,7.571 ; P1.24@35.608,1.452 ccw(c35.608,1.592) 35.747,1.592 35.747,6.337 ccw(c35.511,6.337) 35.511,6.573 ccw(c35.511,6.809) 35.747,6.809 C63.2@35.747,7.563
CMLOUT_AC_N: C64.1 U6.31 | length 17.8
  Bottom Layer w0.268: C64.1@36.34,8.091 cw(c36.5,8.251) 36.274,8.251 36.274,10.338 cw(c37.585,10.338) 36.658,11.266 36.907,11.515 ccw(c35.27,13.152) 37.585,13.152 37.585,14.842 cw(c38.121,14.842) 37.742,15.221 37.747,15.225 ccw(c36.181,16.791) 38.395,16.791 U6.31@38.395,25.292
CMLOUT_AC_P: C63.1 U6.32 | length 17.8
  Bottom Layer w0.268: C63.1@35.68,8.091 cw(c35.781,8.091) 35.71,8.163 ccw(c35.622,8.251) 35.746,8.251 35.746,10.338 cw(c37.585,10.338) 36.285,11.639 36.533,11.887 ccw(c35.267,13.153) 37.057,13.153 37.057,14.846 cw(c38.113,14.846) 37.366,15.592 37.369,15.594 ccw(c36.166,16.797) 37.867,16.797 U6.32@37.867,25.292
CMLOUT_B_N: C61.2 P1.32 R81.1 | length 7.8
  Bottom Layer w0.268: P1.32@38.8,1.4 cw(c38.8,1.525) 38.675,1.525 38.675,6.284 cw(c38.911,6.284) R81.1@38.911,6.52 ; 38.675,6.756 ccw(c38.911,6.756) R81.1@38.911,6.52 ; 38.675,6.756 ccw(c38.911,6.756) R81.1@38.911,6.52 ; 38.675,6.756 C61.2@38.675,7.512 ; 38.675,6.756 C61.2@38.675,7.512 ; C61.2@38.675,7.512 cw(c38.734,7.512) C61.2@38.734,7.571 ccw(c38.734,7.512) C61.2@38.675,7.512
CMLOUT_B_P: C60.2 P1.30 R81.2 | length 7.8
  Bottom Layer w0.268: P1.30@38,1.4 ccw(c38,1.547) 38.147,1.547 38.147,6.284 ccw(c37.911,6.284) R81.2@37.911,6.52 ; R81.2@37.911,6.52 ccw(c37.911,6.756) 38.147,6.756 ; R81.2@37.911,6.52 ccw(c37.911,6.756) 38.147,6.756 ; 38.147,6.756 C60.2@38.147,7.498 ; 38.147,6.756 C60.2@38.147,7.498 ; C60.2@38.147,7.498 ccw(c38.073,7.498) C60.2@38.073,7.571 cw(c38.073,7.498) C60.2@38.147,7.498
CMLOUT_BC_N: C61.1 U6.29 | length 17.9
  Bottom Layer w0.268: C61.1@38.734,8.091 cw(c38.894,8.251) 38.668,8.251 38.668,12.571 cw(c40.61,12.571) 39.237,13.945 39.271,13.979 ccw(c37.103,16.147) 40.169,16.147 40.169,21.16 ccw(c38.848,21.16) 39.782,22.095 cw(c40.716,23.029) 39.395,23.029 39.395,25.292 U6.29@39.367,25.292
CMLOUT_BC_P: C60.1 U6.30 | length 17.8
  Bottom Layer w0.268: C60.1@38.073,8.091 cw(c38.175,8.091) 38.103,8.163 ccw(c38.015,8.251) 38.14,8.251 38.14,12.571 cw(c40.61,12.571) 38.863,14.318 38.897,14.352 ccw(c37.101,16.148) 39.641,16.148 39.641,20.942 ccw(c38.32,20.942) 39.254,21.876 cw(c40.188,22.81) 38.867,22.81 U6.30@38.867,25.292
CTRL_VCXO: C38.1 R20.1 U5.41 | length 51.7
  TopLayer w0.25: v2(54.947,15.911) 54.06,16.799 54.06,21.746 54.999,22.685 59.752,22.685 62.509,25.443 62.509,26.803 62.996,27.29 67.454,27.29 v2(67.979,27.815) ; R20.1@57.569,50.14 C38.1@59.269,50.14 59.269,49.298 v1(59.722,48.844)
  Layer 2 w0.3: v1(59.722,48.844) 61.646,46.921 61.646,44.374 67.979,38.041 v2(67.979,27.815)
  Bottom Layer w0.25: U5.41@54.943,15.306 54.945,15.309 54.945,15.909 v2(54.947,15.911)
EN_5V: U2.3 U8.17 | length 52.1
  TopLayer w0.25: U2.3@4.784,55.662 4.934,55.662 5.159,55.437 5.159,54.948 5.858,54.249 5.858,52.548 5.546,52.236 v1(5.546,51.39) ; U8.17@23.66,22.079 23.668,22.072 23.668,20.257 v2(23.675,20.249)
  Layer 2 w0.25: v1(5.546,51.39) 5.546,48.871 6.667,47.75 6.667,33.055 v1(6.243,32.632)
  Layer 3 w0.25: v2(13.804,26.121) 15.081,26.121 15.779,25.423 16.792,25.423 19.253,22.961 19.253,22.221 19.854,21.62 21.93,21.62 22.116,21.434 22.116,20.233 22.31,20.039 23.429,20.039 23.64,20.249 v2(23.675,20.249)
  Bottom Layer w0.25: v1(6.243,32.632) 6.285,32.673 8.667,32.673 9.207,32.133 9.207,28.743 10.008,27.942 11.506,27.942 13.328,26.121 v2(13.804,26.121)
EN_LMK_1V8: U8.2 U15.6 | length 8.2
  TopLayer w0.25: v2(21.766,31.517) 21.773,31.517 22.26,32.004 22.43,32.004 22.445,32.019 U15.6@22.445,32.304 ; U8.2@25.61,27.779 25.629,27.798 25.629,28.829 25.67,28.87 v2(25.67,28.887)
  Layer 2 w0.25: v2(21.766,31.517) 21.82,31.517 22.011,31.708 24.046,31.708 25.67,30.084 v2(25.67,28.887)
EN_LMK_3V3: U8.1 U15.20 | length 13.1
  TopLayer w0.25: v2(21.823,36.703) 22.284,36.703 22.43,36.557 22.43,36.269 U15.20@22.445,36.254 ; U8.1@26.26,27.779 v2@26.26,28.491
  Layer 2 w0.25: v2(21.823,36.703) 21.823,32.662 22.17,32.315 24.069,32.315 26.617,29.768 26.617,28.848 v2@26.26,28.491
  other v2: 26.259,28.491
EN_LMK_SPI: R87.2 U8.22 | length 7
  TopLayer w0.25: U8.22@27.16,22.979 27.425,22.979 27.971,22.433 27.971,22.211 v2(28,22.183)
  Bottom Layer w0.25: v2(28,22.183) 27.559,21.742 27.559,17.393 R87.2@28.1,16.852
EN_LTC_SPI: R13.2 U8.21 | length 7.2
  TopLayer w0.25: v2(26.26,20.233) U8.21@26.26,22.079
  Bottom Layer w0.25: v2(26.26,20.233) 26.26,17.377 27.141,16.496 27.44,16.496 28.05,15.886 R13.2@28.05,15.836
EN_POWER_LTC2122: U8.18 U14.4 | length 10.7
  TopLayer w0.25: v2(19.855,14.942) 19.883,14.97 19.883,15.219 20.048,15.384 U14.4@20.323,15.384 ; v2(24.31,19.594) U8.18@24.31,22.079
  Layer 2 w0.25: v2(19.855,14.942) 20.641,15.728 20.641,17.48 22.754,19.594 v2(24.31,19.594)
EN_RF_P_1: U4_U_RF_ANT_L.14 U7.26 | length 28.1
  TopLayer w0.25: v1(11.348,57.083) 11.348,56.393 11.944,55.797 U7.26@11.944,52.47
  Layer 2 w0.25: v1(11.348,57.083) 11.348,58.672 15.183,62.506 15.183,69.971 18.416,73.205 18.416,75.984 v1(18.743,76.311)
  Bottom Layer w0.15: v1(18.743,76.311) 18.743,76.249 18.944,76.048 U4_U_RF_ANT_L.14@18.944,75.464
EN_RF_P_2: U4_U_RF_ANT_M.14 U7.17 | length 52.7
  TopLayer w0.25: U7.17@15.443,48.97 17.87,48.97 18.493,49.593 v1(18.7,49.592)
  Layer 2 w0.25: v1(24.248,56.4) 23.6,57.048 23.6,58.82 25.66,60.881 29.436,60.881 29.9,61.345 29.9,63.868 36.432,70.4 49.208,70.4 51.308,72.5 v1(51.308,73.348)
  Layer 3 w0.25: v1(18.7,49.592) 20.025,49.592 20.4,49.967 20.4,50.2 22.223,52.023 22.223,54.375 v1(24.248,56.4)
  Bottom Layer w0.25: U4_U_RF_ANT_M.14@50.928,74.119 50.928,73.74 51.308,73.36 v1(51.308,73.348)